# Altium PCB MONO65_A2.PcbDoc (part 3 of 4)
Units mm, origin at the board's own origin, x right, y up, seen from the top; angles counter-clockwise.
Board outline 304.6 x 95.05 mm, 2 copper layers (Component Side, Solder Side), stack 1.586 mm thick; 275 components, 185 nets, 1029 pads, 156 vias.
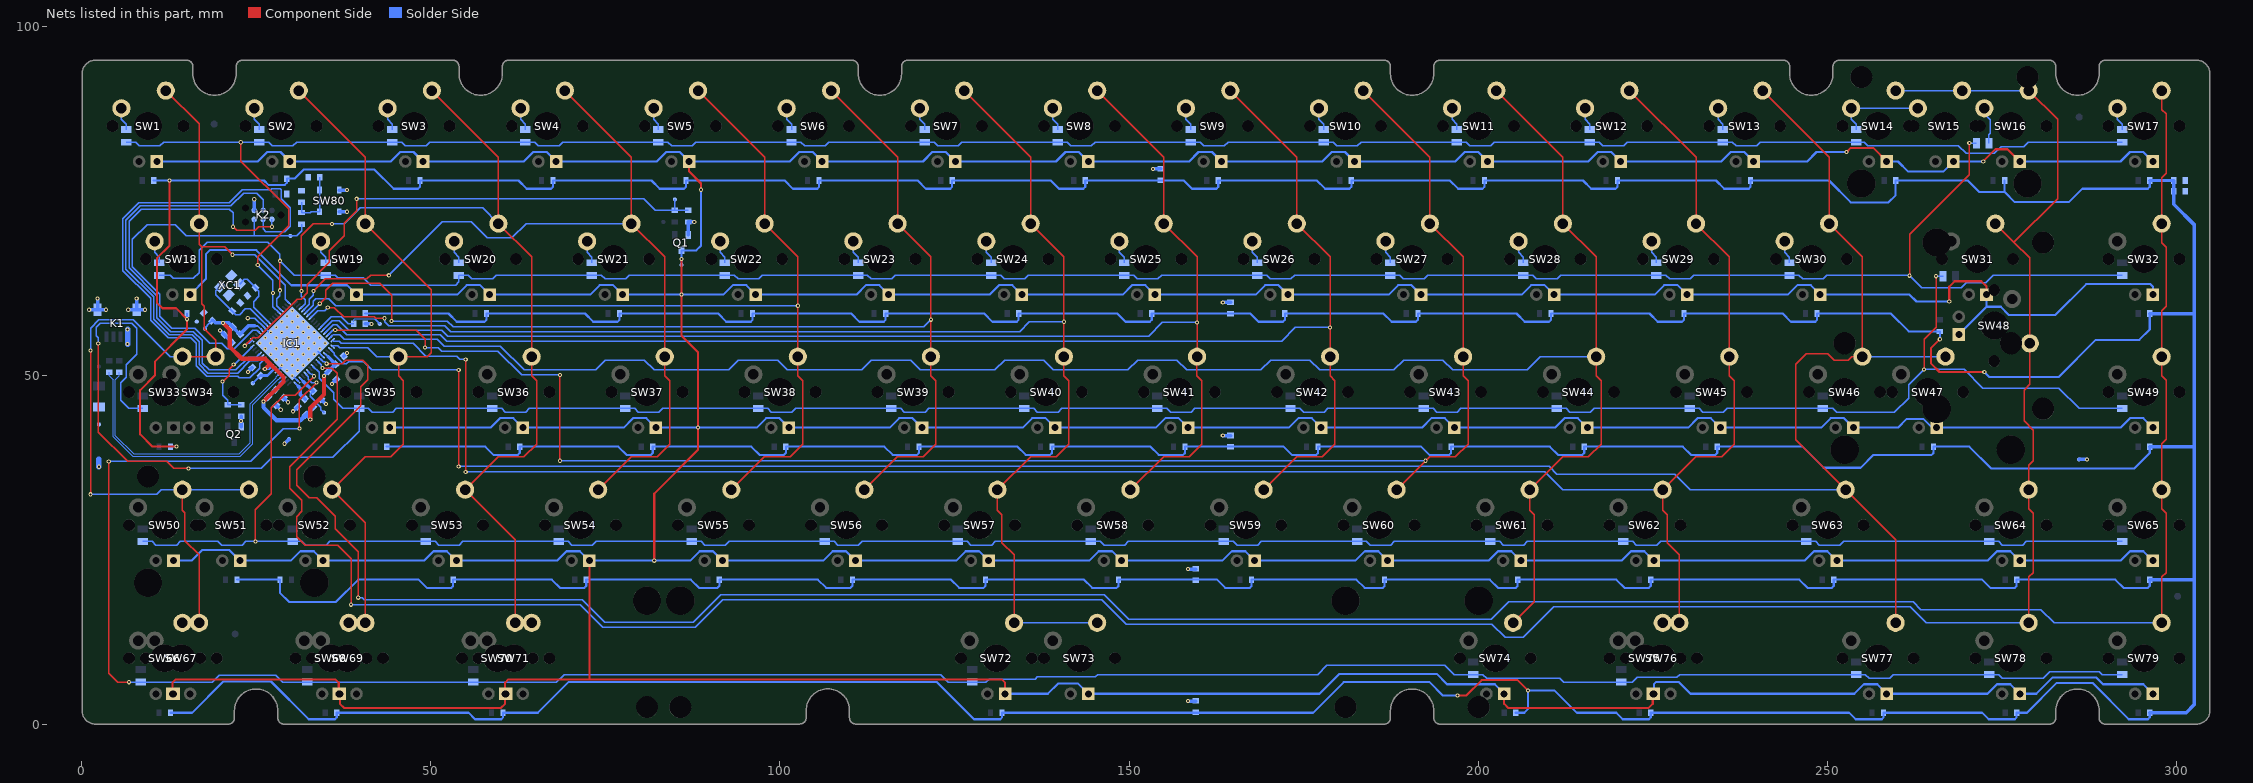
[diagram p2: the nets of this part, all layers, seen from the top]

## Via types
v1: diameter 0.6, hole 0.3, Component Side to Solder Side, tented both sides, 107 vias
v2: diameter 0.5, hole 0.2, Component Side to Solder Side, tented top, 49 vias

## Nets (pads, with @x,y where several pads share a name; then routed paths per layer and width w, separated by ;. In a path a pad name is that pad's centre, name@x,y a point inside that pad or via, vN(x,y) a via of type N, cw(c..) or ccw(c..) an arc to the next point about the centre after c; other vN are vias at no path point) (continued)
5V_LED: C12.1 C13.1 C14.1 C15.1 C16.1 R10.2 R11.1 R17.1 R18.1 R19.1 R20.1 R21.1 R22.1 R23.1 R24.1 R25.1 R26.1 R27.1 R28.1 R29.1 R30.1 R32.1 R33.1 R34.1 R35.1 R36.1 R37.1 R38.1 R39.1 R40.1 R41.1 R42.1 R43.1 R44.1 R45.1 R46.1 R47.1 R48.1 R49.1 R50.1 R51.1 R52.1 R53.1 R54.1 R55.1 R56.1 R57.1 R58.1 R59.1 R61.1 R63.1 R64.1 R66.1 R67.1 R68.1 R69.1 R70.1 R71.1 R72.1 R73.1 R74.1 R75.1 R76.1 R77.1 R78.1 R79.1 R80.1 R82.1 R84.1 R86.1 R88.1 R89.1 R91.1 R92.1 R93.1 R94.2 | length 1637.9
  Component Side w0.3: v1(12.6,77.925) 12.6,68.6 10.795,66.795 10.795,60.433 11.589,59.638 13.542,59.638 v1(15.112,58.068) 15.112,56.612 10.5,52 10.5,50 8.4,47.9 8.4,41.6 10.175,39.825 v1(13.607,39.825) ; v1(197,4.2) 198.241,4.2 200.441,6.4 205.6,6.4 v1(207.1,4.9) ; v1(266.044,55.2) 264.8,53.956 264.8,51.7 266,50.5 v1(272.414,50.5)
  Solder Side w0.3: R17.1@10.35,77.925 v1(12.6,77.925) 26.133,77.925 26.758,77.3 29.122,77.3 29.4,77.578 R18.1@29.4,78.2 30.5,78.2 31.8,79.5 41.937,79.5 44.687,76.75 48.187,76.75 48.45,77.013 R19.1@48.45,77.925 62.562,77.925 63.737,76.75 67.237,76.75 67.5,77.013 R20.1@67.5,77.925 81.612,77.925 82.787,76.75 86.287,76.75 86.55,77.013 R21.1@86.55,77.925 100.662,77.925 101.837,76.75 105.337,76.75 105.6,77.013 R22.1@105.6,77.925 119.712,77.925 120.887,76.75 124.387,76.75 124.65,77.013 R23.1@124.65,77.925 138.762,77.925 139.937,76.75 143.437,76.75 143.7,77.013 R24.1@143.7,77.925 157.812,77.925 158.987,76.75 162.487,76.75 162.75,77.013 R25.1@162.75,77.925 176.862,77.925 178.037,76.75 181.537,76.75 181.8,77.013 R26.1@181.8,77.925 195.912,77.925 197.087,76.75 200.587,76.75 200.85,77.013 R27.1@200.85,77.925 214.962,77.925 216.137,76.75 219.637,76.75 219.9,77.013 R28.1@219.9,77.925 234.012,77.925 235.187,76.75 238.687,76.75 238.95,77.013 R29.1@238.95,77.925 250.175,77.925 253.3,74.8 258.7,74.8 259.725,75.825 R30.1@259.725,77.925 270.048,77.925 271.698,76.275 275.325,76.275 ; R11.1@12.732,39.825 v1(13.607,39.825) ; R80.1@12.732,1.725 15.832,1.725 20.307,6.2 27.131,6.2 32.531,0.8 36.288,0.8 36.544,1.056 R82.1@36.544,1.725 55.418,1.725 56.343,0.8 60.1,0.8 60.356,1.056 R84.1@60.356,1.725 65.325,1.725 69.7,6.1 122.481,6.1 127.781,0.8 131.538,0.8 131.794,1.056 R86.1@131.794,1.725 176.325,1.725 180.7,6.1 193,6.1 194.9,4.2 v1(197,4.2) ; v1(15.112,58.068) R33.1@15.112,58.875 ; R64.1@22.257,20.775 R66.1@28.407,20.775 28.407,18.893 29.7,17.6 36.444,17.6 39.619,20.775 48.275,20.775 49.45,19.6 52.95,19.6 53.213,19.863 R67.1@53.213,20.775 67.325,20.775 68.5,19.6 72,19.6 72.263,19.863 R68.1@72.263,20.775 87.225,20.775 88.4,19.6 91.05,19.6 91.313,19.863 R69.1@91.313,20.775 105.425,20.775 106.6,19.6 110.1,19.6 110.363,19.863 R70.1@110.363,20.775 124.475,20.775 125.65,19.6 129.15,19.6 129.413,19.863 R71.1@129.413,20.775 143.525,20.775 144.7,19.6 148.2,19.6 148.463,19.863 R72.1@148.463,20.775 162.575,20.775 163.75,19.6 167.25,19.6 167.513,19.863 R73.1@167.513,20.775 182.525,20.775 183.7,19.6 186.3,19.6 186.563,19.863 R74.1@186.563,20.775 201.625,20.775 202.8,19.6 205.35,19.6 205.613,19.863 R75.1@205.613,20.775 219.725,20.775 220.9,19.6 224.4,19.6 224.663,19.863 R76.1@224.663,20.775 245.919,20.775 247.094,19.6 250.594,19.6 250.857,19.863 R77.1@250.857,20.775 272.113,20.775 273.288,19.6 276.788,19.6 277.051,19.863 R78.1@277.051,20.775 291.162,20.775 292.337,19.6 295.837,19.6 296.1,19.863 R79.1@296.1,20.775 ; R34.1@40.625,58.875 52.538,58.875 53.713,57.7 57.712,57.7 57.975,57.963 R35.1@57.975,58.875 72.087,58.875 73.262,57.7 76.762,57.7 77.025,57.963 R36.1@77.025,58.875 91.137,58.875 92.312,57.7 95.812,57.7 96.075,57.963 R37.1@96.075,58.875 110.187,58.875 111.362,57.7 114.862,57.7 115.125,57.963 R38.1@115.125,58.875 129.237,58.875 130.412,57.7 133.912,57.7 134.175,57.963 R39.1@134.175,58.875 148.287,58.875 149.462,57.7 152.962,57.7 153.225,57.963 R40.1@153.225,58.875 167.337,58.875 168.512,57.7 172.012,57.7 172.275,57.963 R41.1@172.275,58.875 186.387,58.875 187.562,57.7 191.062,57.7 191.325,57.963 R42.1@191.325,58.875 205.437,58.875 206.612,57.7 210.112,57.7 210.375,57.963 R43.1@210.375,58.875 224.487,58.875 225.662,57.7 229.162,57.7 229.425,57.963 R44.1@229.425,58.875 243.537,58.875 244.712,57.7 248.212,57.7 248.475,57.963 R45.1@248.475,58.875 259.025,58.875 261.575,56.325 R61.1@266.044,56.325 v1(266.044,55.2) ; R48.1@43.688,39.825 57.8,39.825 58.975,38.65 62.475,38.65 62.738,38.913 R49.1@62.738,39.825 76.85,39.825 78.025,38.65 81.525,38.65 81.788,38.913 R50.1@81.788,39.825 95.9,39.825 97.075,38.65 100.575,38.65 100.838,38.913 R51.1@100.838,39.825 114.95,39.825 116.125,38.65 119.625,38.65 119.888,38.913 R52.1@119.888,39.825 134,39.825 135.175,38.65 138.675,38.65 138.938,38.913 R53.1@138.938,39.825 153.05,39.825 154.225,38.65 157.725,38.65 157.988,38.913 R54.1@157.988,39.825 172.1,39.825 173.275,38.65 176.775,38.65 177.038,38.913 R55.1@177.038,39.825 191.798,39.825 192.973,38.65 195.825,38.65 196.088,38.913 R56.1@196.088,39.825 210.2,39.825 211.375,38.65 214.875,38.65 215.138,38.913 R57.1@215.138,39.825 229.25,39.825 230.425,38.65 233.925,38.65 234.188,38.913 R58.1@234.188,39.825 246.402,39.825 249.427,36.8 254.705,36.8 256.555,38.65 264.881,38.65 265.144,38.913 R59.1@265.144,39.825 270.275,39.825 273.4,36.7 293.887,36.7 296.1,38.913 R63.1@296.1,39.825 ; R88.1@205.325,1.725 206.55,1.725 207.1,2.275 v1(207.1,4.9) 210.9,4.9 214.075,1.725 219.725,1.725 220.65,0.8 224.407,0.8 224.663,1.056 R89.1@224.663,1.725 253.062,1.725 253.987,0.8 257.744,0.8 258,1.056 R91.1@258,1.725 272.112,1.725 273.037,0.8 276.794,0.8 277.05,1.056 R92.1@277.05,1.725 278.525,1.725 282.8,6 287.9,6 293.1,0.8 295.844,0.8 296.1,1.056 R93.1@296.1,1.725 ; v1(272.414,50.5) 273.114,49.8 283.075,49.8 288.375,55.1 294.6,55.1 296.1,56.6 R47.1@296.1,58.875 ; R46.1@275.325,77.925 275.325,76.275 ; R32.1@296.1,77.925 296.1,77.013 295.837,76.75 286.45,76.75 284.52,74.82 276.78,74.82 275.325,76.275
  Solder Side w0.5: R93.1@296.1,1.725 301.3,1.725 302.5,2.925 302.5,20.775 ; R79.1@296.1,20.775 302.5,20.775 ; R63.1@296.1,39.825 302.5,39.825 ; R47.1@296.1,58.875 302.5,58.875 ; R32.1@296.1,77.925 R94.2@299.53,77.925 R10.2@299.53,76.4 299.53,74.525 302.5,71.555 302.5,58.875 ; 302.5,20.775 302.5,39.825 ; 302.5,39.825 302.5,58.875
5V_MCU: C1.1 C2.1 C4.1 C5.1 C6.1 C7.1 C8.1 IC1.3 IC1.8 IC1.21 IC1.52 R6.2 R8.2 TP8.1 | length 56.9
  Component Side w0.6: v1(20.25,57.525) 21.24,56.535 21.24,54.11 22.95,52.4 26.3,52.4 28.9,49.8 28.9,49.103 v1(26.063,46.265) ; v1(26.25,50.925) 27,51.675 ; v1(32.75,43.725) 32.75,45.35 34.701,47.301 v1(34.701,49.953)
  Solder Side w0.2: TP8.1@17.7,56.7 17.7,56.781 18.017,57.098 18.017,57.183 R8.2@18.671,57.837 R8.2@18.741,57.907 ; v1(26.25,50.925) 26.855,50.925 27.252,51.322 IC1.8@27.266,51.322
  Solder Side w0.25: 24.8,57.1 25.235,57.1 IC1.21@25.851,56.484 ; 28.625,49.15 28.629,49.15 IC1.3@29.033,49.554 ; IC1.52@34.902,53.09 35.306,52.686
  Solder Side w0.4: C2.1@27.774,47.976 28.375,48.578 28.375,48.9 28.625,49.15
  Solder Side w0.5: R8.2@18.741,57.907 18.793,57.907 19.156,57.544 20.231,57.544 v1(20.25,57.525) 21.078,57.525 C8.1@21.626,56.976 22.682,55.921 C6.1@22.701,55.921 23.881,57.1 24.8,57.1 ; v1(26.063,46.265) 26.711,46.914 C2.1@27.774,47.976 ; v1(32.75,43.725) C4.1@32.101,44.374 32.115,44.374 R6.2@33.183,45.442 ; v1(34.701,49.953) C7.1@35.349,50.601 ; 35.306,52.681 36.369,51.619 36.368,51.619 C7.1@35.349,50.601 ; C7.1@35.349,50.601 C7.1@35.349,50.601
  Solder Side w0.6: v1(26.063,46.265) 26.063,45.449 27.912,43.6 31.328,43.6 C4.1@32.101,44.374
5V_SYS: C11.1 F1.2 R4.1 R7.1 R8.1 R10.1 R94.1 TP2.1 TP7.1
BCKLT_COM_K: Q1.3 SW1.4 SW2.4 SW3.4 SW4.4 SW5.4 SW6.4 SW7.4 SW8.4 SW9.4 SW10.4 SW11.4 SW12.4 SW13.4 SW14.4 SW15.4 SW16.4 SW17.4 SW18.4 SW19.4 SW20.4 SW21.4 SW22.4 SW23.4 SW24.4 SW25.4 SW26.4 SW27.4 SW28.4 SW29.4 SW30.4 SW31.4 SW32.4 SW35.4 SW36.4 SW37.4 SW38.4 SW39.4 SW40.4 SW41.4 SW42.4 SW43.4 SW44.4 SW45.4 SW46.4 SW47.4 SW48.4 SW49.4 SW50.4 SW51.4 SW52.4 SW53.4 SW54.4 SW55.4 SW56.4 SW57.4 SW58.4 SW59.4 SW60.4 SW61.4 SW62.4 SW63.4 SW64.4 SW65.4 SW66.4 SW67.4 SW68.4 SW69.4 SW70.4 SW71.4 SW72.4 SW73.4 SW74.4 SW75.4 SW76.4 SW77.4 SW78.4 SW79.4 TP10.1 | length 1576.6
  Component Side w0.3: SW67.4@13.018,4.445 13.018,6.018 13.502,6.502 ; 13.502,6.5 36.348,6.5 36.83,6.018 SW69.4@36.83,4.445 ; SW68.4@36.989,4.445 36.989,3.011 37.6,2.4 60.031,2.4 60.642,3.011 SW71.4@60.642,4.445 60.642,6.018 61.124,6.5 131.757,6.5 132.239,6.018 SW72.4@132.239,4.445 ; 72.708,6.502 SW54.4@72.708,23.495 ; v1(82,23.495) 82,33.1 88.265,39.365 v1(88.265,42.545) 88.265,53.335 85.9,55.7 v1(85.9,61.595) v1(85.9,66.7) ; SW5.4@86.995,80.645 86.995,79.205 88.7,77.5 v1(88.7,76.6) ; SW74.4@203.677,4.445 203.677,3.011 204.287,2.4 224.275,2.4 224.3,2.425 224.363,2.425 224.949,3.011 SW76.4@224.949,4.445 ; v1(252.7,82) 253.3,82.6 256.49,82.6 SW14.4@258.445,80.645 ; v1(267.4,60.6) 267.4,62.739 268.161,63.5 272,63.5 272.732,62.768 SW31.4@272.732,61.595 ; v1(272.27,80.645) 272.27,80.67 274,82.4 275.74,82.4 SW16.4@277.495,80.645
  Solder Side w0.3: SW1.4@10.795,80.645 25.22,80.645 26.575,82 28.49,82 SW2.4@29.845,80.645 44.27,80.645 45.625,82 47.54,82 SW3.4@48.895,80.645 63.32,80.645 64.675,82 66.59,82 SW4.4@67.945,80.645 82.37,80.645 83.725,82 85.64,82 SW5.4@86.995,80.645 101.42,80.645 102.775,82 104.69,82 SW6.4@106.045,80.645 120.47,80.645 121.825,82 123.74,82 SW7.4@125.095,80.645 139.52,80.645 140.875,82 142.79,82 SW8.4@144.145,80.645 158.57,80.645 159.925,82 161.84,82 SW9.4@163.195,80.645 177.62,80.645 178.975,82 180.89,82 SW10.4@182.245,80.645 196.67,80.645 198.025,82 199.94,82 SW11.4@201.295,80.645 215.72,80.645 217.075,82 218.99,82 SW12.4@220.345,80.645 234.77,80.645 236.125,82 238.04,82 SW13.4@239.395,80.645 247.045,80.645 248.4,82 v1(252.7,82) ; SW50.4@13.177,23.495 15.747,23.495 17.252,25 21.197,25 SW51.4@22.702,23.495 29.983,23.495 31.338,24.85 33.253,24.85 SW52.4@34.608,23.495 49.033,23.495 50.388,24.85 52.303,24.85 SW53.4@53.658,23.495 68.083,23.495 69.438,24.85 71.353,24.85 SW54.4@72.708,23.495 v1(82,23.495) 87.133,23.495 88.488,24.85 90.403,24.85 SW55.4@91.758,23.495 106.183,23.495 107.538,24.85 109.453,24.85 SW56.4@110.808,23.495 125.233,23.495 126.588,24.85 128.503,24.85 SW57.4@129.858,23.495 144.283,23.495 145.638,24.85 147.553,24.85 SW58.4@148.908,23.495 163.333,23.495 164.688,24.85 166.603,24.85 SW59.4@167.958,23.495 182.383,23.495 183.738,24.85 185.653,24.85 SW60.4@187.008,23.495 201.433,23.495 202.788,24.85 204.703,24.85 SW61.4@206.058,23.495 220.483,23.495 221.838,24.85 223.753,24.85 SW62.4@225.108,23.495 246.677,23.495 248.032,24.85 249.947,24.85 SW63.4@251.302,23.495 272.871,23.495 274.226,24.85 276.141,24.85 SW64.4@277.496,23.495 291.921,23.495 293.276,24.85 295.191,24.85 SW65.4@296.545,23.495 ; SW18.4@15.557,61.595 17.85,63.888 17.85,67.425 18.375,67.95 25.017,67.95 30.039,62.927 38.038,62.927 SW19.4@39.37,61.595 53.795,61.595 55.15,62.95 57.065,62.95 SW20.4@58.42,61.595 72.845,61.595 74.2,62.95 76.115,62.95 SW21.4@77.47,61.595 v1(85.9,61.595) 91.895,61.595 93.25,62.95 95.165,62.95 SW22.4@96.52,61.595 110.945,61.595 112.3,62.95 114.215,62.95 SW23.4@115.57,61.595 129.995,61.595 131.35,62.95 133.265,62.95 SW24.4@134.62,61.595 149.045,61.595 150.4,62.95 152.315,62.95 SW25.4@153.67,61.595 168.095,61.595 169.45,62.95 171.365,62.95 SW26.4@172.72,61.595 187.145,61.595 188.5,62.95 190.415,62.95 SW27.4@191.77,61.595 206.195,61.595 207.55,62.95 209.465,62.95 SW28.4@210.82,61.595 225.245,61.595 226.6,62.95 228.515,62.95 SW29.4@229.87,61.595 244.295,61.595 245.65,62.95 247.565,62.95 SW30.4@248.92,61.595 261.705,61.595 262.7,60.6 v1(267.4,60.6) ; SW35.4@44.133,42.545 58.558,42.545 59.913,43.9 61.828,43.9 SW36.4@63.183,42.545 77.608,42.545 78.963,43.9 80.878,43.9 SW37.4@82.233,42.545 v1(88.265,42.545) 96.658,42.545 98.013,43.9 99.928,43.9 SW38.4@101.283,42.545 115.708,42.545 117.063,43.9 118.978,43.9 SW39.4@120.333,42.545 134.758,42.545 136.113,43.9 138.028,43.9 SW40.4@139.383,42.545 153.808,42.545 155.163,43.9 157.078,43.9 SW41.4@158.433,42.545 172.858,42.545 174.213,43.9 176.128,43.9 SW42.4@177.483,42.545 191.908,42.545 193.263,43.9 195.178,43.9 SW43.4@196.533,42.545 210.958,42.545 212.313,43.9 214.228,43.9 SW44.4@215.583,42.545 230.008,42.545 231.363,43.9 233.278,43.9 SW45.4@234.633,42.545 249.058,42.545 250.413,43.9 252.328,43.9 SW46.4@253.683,42.545 260.058,42.545 261.313,43.8 263.7,43.8 264.955,42.545 SW47.4@265.589,42.545 291.92,42.545 293.275,43.9 295.19,43.9 SW49.4@296.545,42.545 ; TP10.1@85.9,65.825 v1(85.9,66.7) Q1.3@85.9,67.925 88.025,67.925 88.7,68.6 v1(88.7,76.6) ; SW72.4@132.239,4.445 138.345,4.445 139.8,5.9 142.69,5.9 SW73.4@144.145,4.445 177.245,4.445 180.1,7.3 194,7.3 195.5,5.8 202.322,5.8 SW74.4@203.677,4.445 ; SW75.4@225.108,4.445 225.108,5.808 225.4,6.1 228.7,6.1 230.355,4.445 253.82,4.445 255.175,5.8 257.09,5.8 SW77.4@258.445,4.445 ; SW14.4@258.445,80.645 260.055,80.645 261.5,79.2 266.525,79.2 SW15.4@267.97,80.645 v1(272.27,80.645) ; SW77.4@258.445,4.445 272.87,4.445 274.225,5.8 276.14,5.8 SW78.4@277.495,4.445 279.845,4.445 282.2,6.8 288.4,6.8 289.4,5.8 295.19,5.8 SW79.4@296.545,4.445 ; SW48.4@268.764,55.88 272.732,59.848 ; SW31.4@272.732,61.595 272.732,59.848 ; SW16.4@277.495,80.645 291.92,80.645 293.275,82 295.19,82 SW17.4@296.545,80.645 ; SW32.4@296.545,61.595 296.545,62.755 296.205,63.095 286.995,63.095 282.575,58.675 275.937,58.675 274.764,59.848 272.732,59.848
GND: C1.2 C2.2 C3.2 C4.2 C5.2 C6.2 C7.2 C8.2 C9.2 C10.2 C12.2 C13.2 C14.2 C15.2 C16.2 IC1.6 IC1.22 IC1.53 IC1.63 IC1.65 K1.0 K1.4 K2.6 Q1.2 Q2.2 R3.2 R9.1 R14.2 R16.2 SW80.2 TP3.1 TP4.1 TP19.1 XC1.2 XC1.4 | length 43.2
  Solder Side w0.2: v1(23.808,58.215) 24.827,58.215 IC1.22@26.205,56.837
  Solder Side w0.25: IC1.22@26.205,56.837 IC1.65@26.877,56.166 ; IC1.6@27.973,50.615 28.644,51.287 v2(28.644,51.499) ; IC1.65@30.341,49.872 IC1.63@31.013,49.201 ; IC1.65@33.877,53.408 IC1.53@34.549,52.736
  Solder Side w0.5: v1(1.1,59.425) K1.0@2.3,59.425 ; v1(2.3,61.025) K1.0@2.3,59.425 ; v1(3.5,59.425) K1.0@2.3,59.425 ; v1(6.7,59.425) K1.0@7.9,59.425 ; v1(7.9,61.025) K1.0@7.9,59.425 ; v1(9.1,59.425) K1.0@7.9,59.425 ; v1(19.825,56.472) C8.2@20.474,55.824 21.529,54.768 C6.2@21.549,54.768 ; Q2.2@22.85,42.7 R16.2@22.85,44.175 ; v1(23.825,50.503) C3.2@24.474,51.151 ; K2.6@24.73,73.635 v1(24.73,75.235) ; C1.2@27.876,45.749 v1(28.525,45.1) ; C2.2@28.926,46.824 v1(29.575,46.175) ; v1(29.065,40.241) TP19.1@29.713,40.89 ; v1(30.3,44.878) C4.2@30.949,45.526 ; R3.2@34.342,46.579 v1(34.99,45.93) ; v1(35.853,48.8) C7.2@36.501,49.449 ; SW80.2@36.9,73.45 v1(38,73.45) ; SW80.2@36.9,76.55 v1(38,76.55) ; C5.2@37.526,52.776 v1(38,53.25) ; R9.1@40.625,57.4 v1(41.5,57.4) ; Q1.2@86.85,70.125 R14.2@86.85,72 v1(87.725,72) ; v1(153.4,79.581) C13.2@154.5,79.581 ; v1(158.4,3.4) C14.2@159.5,3.4 ; v1(158.4,22.3) C15.2@159.5,22.3 ; v1(163.4,41.4) C16.2@164.5,41.4 ; v1(163.4,60.466) C12.2@164.5,60.466 ; TP3.1@286,38 v1(287.1,38)
  Solder Side w0.8: v1(2.5,36.95) TP4.1@2.5,38 ; v1(6.6,54.5) K1.4@6.6,55.55 v1(6.6,56.6)
  other v1: 22.85,43.5
  other v2: 30.2,49.943 29.422,50.721 30.978,50.721 30.2,51.499 31.756,51.499 27.867,52.277 29.422,52.277 30.978,52.277 32.533,52.277 27.089,53.054 28.644,53.054 30.2,53.054 31.756,53.054 33.311,53.054 26.311,53.832 27.867,53.832 29.422,53.832 30.978,53.832 32.533,53.832 34.089,53.832 25.533,54.61 27.089,54.61 28.644,54.61 30.2,54.61 31.756,54.61 33.311,54.61 34.867,54.61 26.311,55.388 27.867,55.388 29.422,55.388 30.978,55.388 32.533,55.388 34.089,55.388 27.089,56.166 28.644,56.166 30.2,56.166 31.756,56.166 33.311,56.166 27.867,56.943 29.422,56.943 30.978,56.943 32.533,56.943 28.644,57.721 30.2,57.721 31.756,57.721 29.422,58.499 30.978,58.499 30.2,59.277
MCU_AREF: IC1.62 R3.1 TP5.1 | length 6.6
  Solder Side w0.2: R3.1@33.175,47.746 33.173,47.744 32.75,47.321 32.75,47.025 34.29,45.485 34.29,45.135 TP5.1@34.725,44.7
  Solder Side w0.25: IC1.62@31.367,49.554 31.771,49.15
  Solder Side w0.5: 31.771,49.146 R3.1@33.173,47.744
MCU_AVCC: IC1.64 R6.1 | length 2.8
  Solder Side w0.25: IC1.64@30.66,48.847 31.064,48.443
  Solder Side w0.5: 31.064,48.439 31.338,48.164 31.338,47.287 R6.1@32.017,46.608
MCU_BCKLT_PWM: IC1.17 R13.1 R14.1 TP11.1 | length 79.6
  Component Side w0.2: v1(23.368,54.259) 24.496,55.388 25.288,55.388 30.86,60.96 31.427,60.96 32.3,61.833 32.3,63 35.5,66.2 35.5,67.9 37.6,70 37.6,71.8 39.4,73.6 v1(39.4,75.3)
  Solder Side w0.2: v1(23.368,54.259) 23.733,54.625 23.992,54.625 IC1.17@24.437,55.07 ; v1(39.4,75.3) 80.5,75.3 82.15,73.65 R13.1@84.95,73.65 ; TP11.1@84.95,75.225 R13.1@84.95,73.65 ; R14.1@86.85,73.65 R13.1@84.95,73.65
MCU_CPSLCK_PWM: IC1.16 R15.1 R16.1 | length 12.3
  Component Side w0.2: v1(20.201,49.146) 21.121,50.066 21.121,50.909 v1(21.792,51.579)
  Solder Side w0.2: v1(20.201,49.146) 20.201,47.216 20.95,46.467 R15.1@20.95,45.825 R16.1@22.85,45.825 ; v1(21.792,51.579) 21.866,51.579 IC1.16@24.437,54.15
MCU_H\W\B\: IC1.43 R9.2 TP9.1 | length 10.2
  Solder Side w0.15: R9.2@38.975,57.7 38.975,57.975 39.15,58.15 41.95,58.15
  Solder Side w0.2: IC1.43@34.195,56.837 35.758,58.4 37.198,58.4 38.198,57.4 R9.2@38.975,57.4 ; 41.95,58.15 TP9.1@42.7,57.4
MCU_MISO: IC1.13 K2.1 | length 61
  Component Side w0.2: v1(21.7,71.3) 22.2,70.8 24.9,70.8 25.4,71.3 v1(27.27,71.3)
  Solder Side w0.2: v1(21.7,71.3) 21.7,73.3 21.179,73.821 8.576,73.821 6.827,72.072 6.827,65.411 10.795,61.443 10.795,58.257 12.764,56.288 16.035,56.288 17.3,55.023 17.3,51.776 18.276,50.8 22.119,50.8 23.919,52.6 24.998,52.6 25.487,53.09 IC1.13@25.498,53.09 ; v1(27.27,71.3) K2.1@27.27,72.365
MCU_MOSI: IC1.12 K2.4 | length 60.6
  Solder Side w0.2: IC1.12@25.851,52.736 25.243,52.128 24.125,52.128 22.343,50.346 18.087,50.346 16.846,51.587 16.846,54.835 15.847,55.833 12.576,55.833 10.341,58.068 10.341,61.255 6.373,65.223 6.373,72.26 8.388,74.276 21.376,74.276 23.2,76.1 25.1,76.1 26,75.2 K2.4@26,73.635
MCU_R\E\S\E\T\: IC1.20 K2.5 R5.2 TP18.1 | length 59.4
  Solder Side w0.2: K2.5@24.73,72.365 24.73,70 ; IC1.20@25.498,56.13 25.484,56.13 25.114,56.5 24.525,56.5 21.857,53.832 20.9,53.832 20.107,54.625 18.375,54.625 16.212,56.788 12.944,56.788 11.225,58.507 11.225,61.652 7.3,65.577 7.3,69.5 9.4,71.6 13.4,71.6 15,70 24.73,70 ; R5.2@31.5,71.675 31.5,70.7 30.8,70 TP18.1@29.9,70 24.73,70
MCU_SCK: IC1.11 K2.3 | length 75.3
  Solder Side w0.2: K2.3@26,72.365 26,71 26.4,70.6 29.1,70.6 29.876,71.376 29.876,74.015 28.592,75.3 28.592,76.633 28.45,76.775 27.251,76.775 27.076,76.6 23,76.6 21.121,74.721 8.203,74.721 5.927,72.445 5.927,65.039 9.895,61.071 9.895,57.884 12.391,55.388 15.662,55.388 16.4,54.65 16.4,51.403 17.903,49.9 22.351,49.9 22.551,49.7 24.125,49.7 25.486,51.061 25.486,51.663 IC1.11@26.205,52.383
MCU_USB_N: IC1.4 R1.2 | length 42.8
  Solder Side w0.135: R1.2@4,50.475 4,49.946 4.533,49.413 4.533,41.244 7.311,38.465 22.733,38.465 24.496,40.228 24.496,45.841 28.155,49.5 28.272,49.5 IC1.4@28.68,49.908
MCU_USB_P: IC1.5 R2.2 | length 41.9
  Solder Side w0.135: R2.2@5.4,50.475 5.4,49.946 4.868,49.413 4.868,41.383 7.45,38.8 22.594,38.8 24.161,40.367 24.161,45.979 27.9,49.718 27.9,49.835 IC1.5@28.326,50.261
MCU_XTAL1: C10.1 IC1.24 XC1.1 | length 9.6
  Solder Side w0.2: XC1.1@22.624,63.095 23.296,63.767 23.744,63.767 C10.1@24.917,62.594 25.408,62.103 25.408,61.35 24.645,60.587 24.645,59.811 IC1.24@26.912,57.544
MCU_XTAL2: C9.1 IC1.23 XC1.3 | length 11.3
  Solder Side w0.2: XC1.3@19.867,62.741 19.245,62.12 19.245,61.566 C9.1@21.569,59.242 22.093,58.718 22.624,58.718 23.473,59.567 24.182,59.567 IC1.23@26.558,57.191
MTRX_C0: IC1.32 SW1.2 SW18.2 SW33.2 SW34.2 SW50.2 SW51.2 SW66.2 SW67.2 | length 147.9
  Component Side w0.2: v1(1.3,33) v1(1.3,53.6) ; SW1.2@12.065,90.805 16.827,86.042 SW18.2@16.827,71.755 16.827,68.797 17.2,68.424 ; SW66.2@14.447,14.605 SW67.2@16.828,14.605 16.828,24.316 14.8,26.344 14.8,30.344 14.447,30.697 SW50.2@14.447,33.655 ; SW33.2@14.446,52.705 SW34.2@19.209,52.705 19.209,55.063 17.557,56.715 17.557,59.94 17.2,60.297 17.2,68.424 ; v1(21.626,67.3) 20.502,68.424 17.2,68.424
  Solder Side w0.2: v1(1.3,33) 10.8,33 11.455,33.655 SW50.2@14.447,33.655 SW51.2@23.972,33.655 ; v1(1.3,53.6) 1.3,56.8 2.475,57.975 7.425,57.975 12.695,52.705 SW33.2@14.446,52.705 ; v1(21.626,67.3) 24.827,67.3 29.2,62.927 29.2,60.913 IC1.32@29.74,60.373
MTRX_C1: IC1.49 SW2.2 SW19.2 SW35.2 SW52.2 SW68.2 SW69.2 | length 109.6
  Component Side w0.2: SW2.2@31.115,90.805 40.64,81.28 SW19.2@40.64,71.755 50.1,62.295 50.1,53.3 49.505,52.705 SW35.2@45.403,52.705 45.4,52.702 45.4,49.943 46.1,49.243 46.1,40.2 44.3,38.4 40.623,38.4 SW52.2@35.878,33.655 40.64,28.893 SW69.2@40.64,14.605 SW68.2@38.259,14.605
  Solder Side w0.2: IC1.49@35.963,54.15 36.113,54.3 36.666,54.3 36.966,54 41,54 42.295,52.705 SW35.2@45.403,52.705
MTRX_C2: IC1.35 SW3.2 SW20.2 SW36.2 SW53.2 SW70.2 SW71.2 | length 135.7
  Component Side w0.2: v1(31.49,62.1) 31.49,69.99 33.2,71.7 v1(35.853,71.7) ; SW3.2@50.165,90.805 59.69,81.28 SW20.2@59.69,71.755 ; SW20.2@59.693,71.758 64.456,66.995 SW36.2@64.456,52.708 ; SW70.2@62.071,14.605 62.071,26.512 SW53.2@54.928,33.655 59.673,38.4 63.35,38.4 65.15,40.2 65.15,49.243 64.45,49.943 SW36.2@64.45,52.702
  Component Side w0.3: SW70.2@62.071,14.605 SW71.2@64.452,14.605
  Solder Side w0.2: IC1.35@31.367,59.666 32,60.299 32,60.871 31.49,61.38 v1(31.49,62.1) ; v1(35.853,71.7) 37.6,71.7 39.916,74.016 57.429,74.016 SW20.2@59.69,71.755
MTRX_C3: IC1.36 SW4.2 SW21.2 SW37.2 SW54.2 | length 124.6
  Component Side w0.2: v1(33.2,62.1) 34.925,63.825 40.875,63.825 41.4,64.35 v1(44,64.35) ; SW4.2@69.215,90.805 78.74,81.28 SW21.2@78.74,71.755 83.503,66.992 SW37.2@83.503,52.705 ; SW54.2@73.978,33.655 78.723,38.4 82.4,38.4 84.2,40.2 84.2,49.243 83.5,49.943 SW37.2@83.5,52.702
  Solder Side w0.2: IC1.36@31.72,59.312 32.046,59.638 32.6,60.192 32.6,60.93 33.2,61.53 v1(33.2,62.1) ; v1(44,64.35) 51.65,72 55.8,72 58.1,69.7 61.613,69.7 63.668,71.755 SW21.2@78.74,71.755
MTRX_C4: IC1.37 SW5.2 SW22.2 SW38.2 SW55.2 | length 141.8
  Component Side w0.2: SW5.2@88.265,90.805 97.79,81.28 SW22.2@97.79,71.755 ; SW55.2@93.028,33.655 97.773,38.4 101.45,38.4 103.25,40.2 103.25,49.243 102.55,49.943 SW38.2@102.55,52.702 ; SW22.2@97.793,71.758 102.556,66.995 v1(102.556,60) SW38.2@102.556,52.708
  Solder Side w0.2: IC1.37@32.074,58.959 32.4,59.285 33.173,60.058 33.173,60.635 33.538,61 35.4,61 36.4,60 v1(102.556,60)
MTRX_C5: IC1.38 SW6.2 SW23.2 SW39.2 SW56.2 | length 166.6
  Component Side w0.2: v1(34.111,60.288) 34.982,61.16 34.982,62.182 36,63.2 42.715,63.2 44.4,61.515 v1(44.4,57.8) ; SW6.2@107.315,90.805 116.84,81.28 SW23.2@116.84,71.755 121.603,66.992 v1(121.603,58) SW39.2@121.603,52.705 ; SW56.2@112.078,33.655 116.823,38.4 120.5,38.4 122.3,40.2 122.3,49.243 121.6,49.943 SW39.2@121.6,52.702
  Solder Side w0.2: IC1.38@32.427,58.605 32.754,58.931 v1(34.111,60.288) ; v1(44.4,57.8) 52.388,57.8 53.212,56.976 120.579,56.976 v1(121.603,58)
MTRX_C6: IC1.39 SW7.2 SW24.2 SW40.2 SW57.2 SW72.2 SW73.2 | length 212.5
  Component Side w0.2: v1(35.256,59.731) 36.199,59.731 37.53,58.4 41.9,58.4 42.1,58.2 v1(43.4,58.2) ; SW7.2@126.365,90.805 135.89,81.28 SW24.2@135.89,71.755 140.653,66.992 v1(140.653,57.7) SW40.2@140.653,52.705 ; SW72.2@133.509,14.605 133.509,24.316 131.775,26.05 131.775,30.05 131.128,30.697 SW57.2@131.128,33.655 135.873,38.4 139.55,38.4 141.35,40.2 141.35,49.243 140.65,49.943 SW40.2@140.65,52.702
  Solder Side w0.2: IC1.39@32.781,58.252 33.107,58.578 33.829,59.3 34.824,59.3 v1(35.256,59.731) ; v1(43.4,58.2) 43.4,57.7 44,57.1 52.038,57.1 52.838,56.3 134.3,56.3 135.7,57.7 v1(140.653,57.7) ; SW72.2@133.509,14.605 SW73.2@145.415,14.605
MTRX_C7: IC1.44 SW8.2 SW25.2 SW41.2 SW58.2 | length 197.2
  Component Side w0.2: SW8.2@145.415,90.805 154.94,81.28 SW25.2@154.94,71.755 159.703,66.992 v1(159.703,57.6) SW41.2@159.703,52.705 ; SW58.2@150.178,33.655 154.923,38.4 158.6,38.4 160.4,40.2 160.4,49.243 159.7,49.943 SW41.2@159.7,52.702
  Solder Side w0.2: IC1.44@34.549,56.484 34.875,56.81 35.89,57.825 36.918,57.825 38.243,56.5 51.57,56.5 52.445,55.625 134.7,55.625 152.775,55.625 154.75,57.6 v1(159.703,57.6)
MTRX_C8: IC1.45 SW9.2 SW26.2 SW42.2 SW59.2 | length 215.9
  Component Side w0.2: SW9.2@164.465,90.805 173.99,81.28 SW26.2@173.99,71.755 178.753,66.992 v1(178.753,56.9) SW42.2@178.753,52.705 ; SW59.2@169.228,33.655 173.973,38.4 177.65,38.4 179.45,40.2 179.45,49.243 178.75,49.943 SW42.2@178.75,52.702
  Solder Side w0.2: IC1.45@34.902,56.13 35.228,56.456 36.072,57.3 36.53,57.3 38.007,55.824 51.364,55.824 52.263,54.925 171.825,54.925 173.8,56.9 v1(178.753,56.9)
MTRX_C9: IC1.46 SW10.2 SW27.2 SW43.2 SW60.2 | length 242.9
  Component Side w0.2: v1(36.325,56.5) 47.9,56.5 49.2,55.2 v1(49.2,54) ; v1(68.5,37.8) v1(68.5,50.1) ; SW10.2@183.515,90.805 193.04,81.28 SW27.2@193.04,71.755 197.803,66.992 SW43.2@197.803,52.705 ; SW60.2@188.278,33.655 v1(192.423,37.8) 193.023,38.4 196.7,38.4 198.5,40.2 198.5,49.243 197.8,49.943 SW43.2@197.8,52.702
  Solder Side w0.2: IC1.46@35.256,55.777 35.582,56.103 35.979,56.5 v1(36.325,56.5) ; v1(49.2,54) 51.071,54 51.6,53.471 59.629,53.471 63,50.1 v1(68.5,50.1) ; v1(68.5,37.8) v1(192.423,37.8)
MTRX_C10: IC1.47 SW11.2 SW28.2 SW44.2 SW61.2 SW74.2 | length 282.7
  Component Side w0.2: SW11.2@202.565,90.805 212.09,81.28 SW28.2@212.09,71.755 216.853,66.992 SW44.2@216.853,52.705 ; SW74.2@204.947,14.605 207.975,17.633 207.975,30.05 207.328,30.697 SW61.2@207.328,33.655 212.073,38.4 215.75,38.4 217.55,40.2 217.55,49.243 216.85,49.943 SW44.2@216.85,52.702
  Solder Side w0.2: IC1.47@35.609,55.423 35.936,55.749 36.01,55.824 36.964,55.824 37.588,55.2 50.963,55.2 51.963,54.2 59.987,54.2 63.387,50.8 73.6,50.8 75,52.2 80.6,52.2 82,50.8 92.65,50.8 94.05,52.2 99.65,52.2 101.05,50.8 111.7,50.8 113.1,52.2 118.7,52.2 120.1,50.8 130.75,50.8 132.15,52.2 137.75,52.2 139.15,50.8 149.8,50.8 151.2,52.2 156.8,52.2 158.2,50.8 168.85,50.8 170.25,52.2 175.85,52.2 177.25,50.8 187.9,50.8 189.3,52.2 194.9,52.2 196.3,50.8 206.95,50.8 208.855,52.705 SW44.2@216.853,52.705
MTRX_C11: IC1.48 SW12.2 SW29.2 SW45.2 SW62.2 SW75.2 SW76.2 | length 300.9
  Component Side w0.2: v1(55,36.2) v1(55,52.3) ; SW12.2@221.615,90.805 231.14,81.28 SW29.2@231.14,71.755 235.903,66.992 SW45.2@235.903,52.705 ; SW75.2@226.378,14.605 SW76.2@228.759,14.605 228.759,24.316 227.025,26.05 227.025,30.05 226.378,30.697 SW62.2@226.378,33.655 231.123,38.4 234.8,38.4 236.6,40.2 236.6,49.243 235.9,49.943 SW45.2@235.9,52.702
  Solder Side w0.2: IC1.48@35.963,55.07 36.133,54.9 36.898,54.9 37.198,54.6 47.497,54.6 49.321,52.776 53.706,52.776 54.183,52.3 v1(55,52.3) ; v1(55,36.2) 209.5,36.2 212.045,33.655 SW62.2@226.378,33.655
MTRX_C12: IC1.50 SW13.2 SW30.2 SW46.2 SW47.2 SW63.2 SW77.2 | length 343.4
  Component Side w0.2: v1(54,37) v1(54,50.8) ; SW13.2@240.665,90.805 250.19,81.28 SW30.2@250.19,71.755 ; SW30.2@250.193,71.758 254.956,66.995 SW46.2@254.956,52.708 ; SW46.2@254.953,52.705 253.406,52.705 252.901,52.2 250.9,52.2 250,53.1 246.933,53.1 245.425,51.592 245.425,40.802 SW63.2@252.572,33.655 259.715,26.511 SW77.2@259.715,14.605
  Solder Side w0.2: IC1.50@35.609,53.797 35.936,53.471 36.206,53.2 36.206,52.944 37.487,51.663 37.923,51.663 38.259,52 40.387,52 41.587,50.8 v1(54,50.8) ; v1(54,37) 210.12,37 211.22,35.9 228.1,35.9 230.345,33.655 SW63.2@252.572,33.655 ; SW46.2@254.953,52.705 SW47.2@266.859,52.705
MTRX_C13: IC1.55 SW14.2 SW15.2 SW16.2 SW31.2 SW48.2 SW64.2 SW78.2 | length 400.6
  Component Side w0.2: v1(34.5,51.1) 34.55,51.05 35.85,51.05 36.583,50.317 36.583,43.752 29.8,36.969 29.8,33.9 31.535,32.165 31.535,30.545 30.8,29.81 30.8,26.9 32,25.7 36.7,25.7 38.6,23.8 v1(38.6,17.2) ; SW31.2@274.002,71.755 276.657,69.1 ; SW78.2@278.765,14.605 278.765,21.165 279.4,21.8 279.4,30.3 278.766,30.934 SW64.2@278.766,33.655 278.766,37.166 279.4,37.8 279.4,42.2 278.1,43.5 278.1,47.9 278.924,48.724 SW48.2@278.924,54.61 278.924,66.833 276.657,69.1 ; SW16.2@278.765,90.805 282.9,86.67 282.9,75.343 276.657,69.1
  Solder Side w0.2: IC1.55@33.842,52.029 34.168,51.703 34.291,51.579 34.291,51.308 v1(34.5,51.1) ; v1(38.6,17.2) 71.4,17.2 74.6,14 87.9,14 91.8,17.9 146.1,17.9 149.6,14.4 201.9,14.4 203.8,12.5 206.4,12.5 210.8,16.9 261.8,16.9 264.095,14.605 SW78.2@278.765,14.605 ; SW14.2@259.715,90.805 SW15.2@269.24,90.805 SW16.2@278.765,90.805
MTRX_C14: IC1.54 SW17.2 SW32.2 SW49.2 SW65.2 SW79.2 | length 392.7
  Component Side w0.2: v1(35.1,51.7) 37.3,51.7 37.8,52.2 40.3,52.2 41,51.5 41,49.4 40,48.4 40,45.7 30.824,36.524 30.824,34.276 32.6,32.5 33.69,32.5 36.348,29.842 36.348,28.052 39.619,24.781 v1(39.619,18.2) ; SW79.2@297.815,14.605 297.815,21.165 298.45,21.8 298.45,30.3 297.816,30.934 SW65.2@297.815,33.655 ; SW65.2@297.815,33.655 297.815,40.215 298.45,40.85 298.45,49.35 297.816,49.984 SW49.2@297.815,52.705 ; SW49.2@297.815,52.705 297.815,59.265 298.45,59.9 298.45,68.4 297.816,69.034 SW32.2@297.815,71.755 ; SW32.2@297.815,71.755 297.815,78.315 298.45,78.95 298.45,87.45 297.816,88.084 SW17.2@297.815,90.805
  Solder Side w0.2: IC1.54@34.195,52.383 34.521,52.056 34.62,51.958 34.842,51.958 v1(35.1,51.7) ; v1(39.619,18.2) 40.2,18.2 40.5,17.9 71.7,17.9 74.9,14.7 87.6,14.7 91.5,18.6 146.4,18.6 149.9,15.1 201.8,15.1 204.3,17.6 262.249,17.6 263.349,16.5 280.5,16.5 282.395,14.605 SW79.2@297.815,14.605
MTRX_R0: D1.1 D2.1 D3.1 D4.1 D5.1 D6.1 D7.1 D8.1 D9.1 D10.1 D11.1 D12.1 D13.1 D14.1 D17.1 IC1.28 | length 323.1
  Component Side w0.2: v1(22.8,83.4) 22.8,80.7 29.65,73.85 29.65,71.45 25.235,67.035 v1(25.235,65.825)
  Solder Side w0.2: D1.1@6.4,83.4 7.75,83.4 8.275,82.875 11.225,82.875 11.75,83.4 v1(22.8,83.4) D2.1@25.45,83.4 26.8,83.4 27.325,82.875 30.275,82.875 30.8,83.4 D3.1@44.5,83.4 45.85,83.4 46.375,82.875 49.325,82.875 49.85,83.4 D4.1@63.55,83.4 64.9,83.4 65.425,82.875 68.375,82.875 68.9,83.4 D5.1@82.6,83.4 83.95,83.4 84.475,82.875 87.425,82.875 87.95,83.4 D6.1@101.65,83.4 103,83.4 103.525,82.875 106.475,82.875 107,83.4 D7.1@120.7,83.4 122.05,83.4 122.575,82.875 125.525,82.875 126.05,83.4 D8.1@139.75,83.4 141.1,83.4 141.625,82.875 144.575,82.875 145.1,83.4 D9.1@158.8,83.4 160.15,83.4 160.675,82.875 163.625,82.875 164.15,83.4 D10.1@177.85,83.4 179.2,83.4 179.725,82.875 182.675,82.875 183.2,83.4 D11.1@196.9,83.4 198.25,83.4 198.775,82.875 201.725,82.875 202.25,83.4 D12.1@215.95,83.4 217.3,83.4 217.825,82.875 220.775,82.875 221.3,83.4 D13.1@235,83.4 236.35,83.4 236.875,82.875 239.825,82.875 240.35,83.4 D14.1@254.05,83.4 255.25,83.4 255.75,82.9 268.7,82.9 269.8,81.8 273.85,81.8 274.825,82.775 278.075,82.775 278.7,83.4 D17.1@292.15,83.4 ; v1(25.235,65.825) 27.4,63.66 v1(27.4,61.8) 27.4,59.885 IC1.28@28.326,58.959
MTRX_R1: D16.1 D18.1 D19.1 D20.1 D21.1 D22.1 D23.1 D24.1 D25.1 D26.1 D27.1 D28.1 D29.1 D30.1 D32.1 IC1.29 | length 326.8
  Component Side w0.2: v1(28.4,66.425) 28.407,66.418 v1(28.407,62.2) ; v1(261.725,64.3) 261.725,70.225 270.273,78.773 v1(270.273,83.275)
  Solder Side w0.2: D18.1@11.162,64.35 12.7,64.35 13.125,63.925 16.025,63.925 16.827,64.727 16.827,67.924 18.003,69.1 26.7,69.1 28.4,67.4 v1(28.4,66.425) 30.475,64.35 D19.1@34.975,64.35 36.325,64.35 36.675,64 40.35,64 41.4,62.95 53.55,62.95 54.025,63.425 D20.1@54.025,64.35 55.375,64.35 55.9,63.825 58.85,63.825 59.375,64.35 D21.1@73.075,64.35 74.425,64.35 74.95,63.825 77.9,63.825 78.425,64.35 D22.1@92.125,64.35 93.475,64.35 94,63.825 96.95,63.825 97.475,64.35 D23.1@111.175,64.35 112.525,64.35 113.05,63.825 116,63.825 116.525,64.35 D24.1@130.225,64.35 131.575,64.35 132.1,63.825 135.05,63.825 135.575,64.35 D25.1@149.275,64.35 150.625,64.35 151.15,63.825 154.1,63.825 154.625,64.35 D26.1@168.325,64.35 169.675,64.35 170.2,63.825 173.15,63.825 173.675,64.35 D27.1@187.375,64.35 188.725,64.35 189.25,63.825 192.2,63.825 192.725,64.35 D28.1@206.425,64.35 207.775,64.35 208.3,63.825 211.25,63.825 211.775,64.35 D29.1@225.475,64.35 226.825,64.35 227.35,63.825 230.3,63.825 230.825,64.35 D30.1@244.525,64.35 245.875,64.35 246.4,63.825 249.35,63.825 249.875,64.35 v1@261.725,64.35 ; v1(28.407,62.2) 28.407,61.449 27.973,61.014 27.973,60.019 IC1.29@28.68,59.312 ; v1(261.725,64.3) 263.475,62.55 269.1,62.55 269.85,63.3 272.65,63.3 273.7,64.35 D32.1@292.15,64.35 ; v1(270.273,83.275) D16.1@271.273,83.275
MTRX_R2: D33.1 D35.1 D36.1 D37.1 D38.1 D39.1 D40.1 D41.1 D42.1 D43.1 D44.1 D45.1 D46.1 D48.1 D49.1 IC1.57 | length 369.9
  Component Side w0.2: v1(2.4,54.6) 2.4,41.9 6.6,37.7 12.2,37.7 13.2,36.7 v1(15.3,36.7) ; v1(263.8,50.875) 263.8,55.2 265.511,56.911 v1(265.511,64.225)
  Solder Side w0.2: v1(2.4,54.6) 2.4,55.4 2.1,55.7 2.1,56.9 2.7,57.5 7.2,57.5 7.9,56.8 7.9,53.05 6.4,51.55 6.4,49.754 5.626,48.981 5.626,46.474 6.8,45.3 D33.1@8.782,45.3 ; v1(15.3,36.7) 25.726,36.7 27.326,38.3 36,38.3 39.738,42.038 D35.1@39.738,45.3 ; IC1.57@33.134,51.322 34.007,50.449 34.007,49.642 36.1,47.549 36.1,46.626 37.426,45.3 D35.1@39.738,45.3 ; v1(265.511,64.225) D48.1@266.511,64.225 ; D49.1@292.15,45.3 285.975,45.3 283.075,48.2 272.2,48.2 269.525,50.875 v1(263.8,50.875) 261.575,48.65 261.575,46.775 259.525,44.725 251.275,44.725 250.7,45.3 D46.1@249.288,45.3 235.588,45.3 235.063,44.775 232.113,44.775 231.588,45.3 D45.1@230.238,45.3 216.538,45.3 216.013,44.775 213.063,44.775 212.538,45.3 D44.1@211.188,45.3 197.488,45.3 196.963,44.775 194.013,44.775 193.488,45.3 D43.1@192.138,45.3 178.438,45.3 177.913,44.775 174.963,44.775 174.438,45.3 D42.1@173.088,45.3 159.388,45.3 158.863,44.775 155.913,44.775 155.388,45.3 D41.1@154.038,45.3 140.338,45.3 139.813,44.775 136.863,44.775 136.338,45.3 D40.1@134.988,45.3 121.288,45.3 120.763,44.775 117.813,44.775 117.288,45.3 D39.1@115.938,45.3 102.238,45.3 101.713,44.775 98.763,44.775 98.238,45.3 D38.1@96.888,45.3 83.188,45.3 82.663,44.775 79.713,44.775 79.188,45.3 D37.1@77.838,45.3 64.138,45.3 63.613,44.775 60.663,44.775 60.138,45.3 D36.1@58.788,45.3 45.088,45.3 44.563,44.775 41.613,44.775 41.088,45.3 D35.1@39.738,45.3
MTRX_R3: D50.1 D52.1 D53.1 D54.1 D55.1 D56.1 D57.1 D58.1 D59.1 D60.1 D61.1 D62.1 D63.1 D64.1 D65.1 IC1.59 | length 319.2
  Component Side w0.2: v1(24.9,26.25) 24.9,30.8 27.2,33.1 27.2,45.4 29,47.2 30.6,47.2 v1(33.3,49.9) v1@33.357,49.843
  Solder Side w0.2: D50.1@8.782,26.25 10.132,26.25 10.657,25.725 13.607,25.725 14.132,26.25 19.525,26.25 20.05,25.725 23,25.725 23.525,26.25 v1(24.9,26.25) D52.1@30.213,26.25 31.563,26.25 32.088,25.725 35.038,25.725 35.563,26.25 D53.1@49.263,26.25 50.613,26.25 51.138,25.725 54.088,25.725 54.613,26.25 D54.1@68.313,26.25 69.663,26.25 70.188,25.725 73.138,25.725 73.663,26.25 D55.1@87.363,26.25 88.713,26.25 89.238,25.725 92.188,25.725 92.713,26.25 D56.1@106.413,26.25 107.763,26.25 108.288,25.725 111.238,25.725 111.763,26.25 D57.1@125.463,26.25 126.813,26.25 127.338,25.725 130.288,25.725 130.813,26.25 D58.1@144.513,26.25 145.863,26.25 146.388,25.725 149.338,25.725 149.863,26.25 D59.1@163.563,26.25 164.913,26.25 165.438,25.725 168.388,25.725 168.913,26.25 D60.1@182.613,26.25 183.963,26.25 184.488,25.725 187.438,25.725 187.963,26.25 D61.1@201.663,26.25 203.013,26.25 203.538,25.725 206.488,25.725 207.013,26.25 D62.1@220.713,26.25 222.063,26.25 222.588,25.725 225.538,25.725 226.063,26.25 D63.1@246.907,26.25 248.257,26.25 248.782,25.725 251.732,25.725 252.257,26.25 D64.1@273.101,26.25 274.451,26.25 274.976,25.725 277.926,25.725 278.451,26.25 D65.1@292.15,26.25 ; IC1.59@32.427,50.615 32.754,50.289 32.877,50.165 33.035,50.165 v1(33.3,49.9)
MTRX_R4: D66.1 D68.1 D70.1 D72.1 D74.1 D75.1 D77.1 D78.1 D79.1 IC1.60 | length 363.6
  Component Side w0.2: v1(3.9,37.7) 3.9,7.407 5.207,6.1 v1(6.8,6.1) ; v1(31.2,42.4) 31.2,46.545 v1(33.655,49)
  Solder Side w0.2: v1(3.9,37.7) 24.198,37.7 28.898,42.4 v1(31.2,42.4) ; v1(6.8,6.1) D66.1@8.482,6.1 18.7,6.1 19.7,7.1 27.8,7.1 28.8,6.1 D68.1@32.294,6.1 D70.1@56.106,6.1 68,6.1 69.1,7.2 123,7.2 124.1,6.1 D72.1@127.544,6.1 129.475,6.1 129.925,6.55 136.525,6.55 136.85,6.875 145.15,6.875 145.475,7.2 177,7.2 178.3,8.5 195.2,8.5 196.5,7.2 D74.1@199.282,7.2 200.632,7.2 201.157,6.675 211.65,6.675 212.225,6.1 D75.1@220.413,6.1 222,6.1 222.7,6.8 228.4,6.8 228.8,7.2 D77.1@254.051,7.2 255.401,7.2 255.926,6.675 258.875,6.675 259.4,7.2 D78.1@273.1,7.2 274.45,7.2 274.975,6.675 280.875,6.675 281.8,7.6 288.9,7.6 289.3,7.2 D79.1@292.15,7.2 ; IC1.60@32.074,50.261 32.5,49.835 32.5,49.501 33.001,49 v1(33.655,49)
NetC3_1: C3.1 IC1.7 TP6.1 | length 3.9
  Solder Side w0.2: TP6.1@24.525,48.9 24.528,48.9 C3.1@25.626,49.999
  Solder Side w0.25: 27.215,50.564 IC1.7@27.619,50.968
  Solder Side w0.4: C3.1@25.626,49.999 26.645,49.999 27.211,50.564
NetC11_2: C11.2 R4.2 R5.1 SW80.1 | length 9.1
  Solder Side w0.2: R4.2@31.5,74.82 R5.1@31.5,73.325 32.781,73.325 32.906,73.45 SW80.1@34.1,73.45 SW80.1@34.1,76.55 C11.2@34.1,78.4
NetD1_2: D1.2 SW1.1 | length 3.3
  Solder Side w0.2: SW1.1@5.715,88.265 5.715,86.685 6.4,86 D1.2@6.4,85.2
NetD2_2: D2.2 SW2.1 | length 3.3
  Solder Side w0.2: SW2.1@24.765,88.265 24.765,86.685 25.45,86 D2.2@25.45,85.2
NetD3_2: D3.2 SW3.1 | length 3.3
  Solder Side w0.2: SW3.1@43.815,88.265 43.815,86.685 44.5,86 D3.2@44.5,85.2
NetD4_2: D4.2 SW4.1 | length 3.3
  Solder Side w0.2: SW4.1@62.865,88.265 62.865,86.685 63.55,86 D4.2@63.55,85.2
NetD5_2: D5.2 SW5.1 | length 3.3
  Solder Side w0.2: SW5.1@81.915,88.265 81.915,86.685 82.6,86 D5.2@82.6,85.2
NetD6_2: D6.2 SW6.1 | length 3.3
  Solder Side w0.2: SW6.1@100.965,88.265 100.965,86.685 101.65,86 D6.2@101.65,85.2
NetD7_2: D7.2 SW7.1 | length 3.3
  Solder Side w0.2: SW7.1@120.015,88.265 120.015,86.685 120.7,86 D7.2@120.7,85.2
NetD8_2: D8.2 SW8.1 | length 3.3
  Solder Side w0.2: SW8.1@139.065,88.265 139.065,86.685 139.75,86 D8.2@139.75,85.2
NetD9_2: D9.2 SW9.1 | length 3.3
  Solder Side w0.2: SW9.1@158.115,88.265 158.115,86.685 158.8,86 D9.2@158.8,85.2
NetD10_2: D10.2 SW10.1 | length 3.3
  Solder Side w0.2: SW10.1@177.165,88.265 177.165,86.685 177.85,86 D10.2@177.85,85.2
NetD11_2: D11.2 SW11.1 | length 3.3
  Solder Side w0.2: SW11.1@196.215,88.265 196.215,86.685 196.9,86 D11.2@196.9,85.2
NetD12_2: D12.2 SW12.1 | length 3.3
  Solder Side w0.2: SW12.1@215.265,88.265 215.265,86.685 215.95,86 D12.2@215.95,85.2
NetD13_2: D13.2 SW13.1 | length 3.3
  Solder Side w0.2: SW13.1@234.315,88.265 234.315,86.685 235,86 D13.2@235,85.2
NetD14_2: D14.2 SW14.1 SW15.1 | length 12.9
  Solder Side w0.2: D14.2@254.05,85.2 254.05,86 253.365,86.685 SW14.1@253.365,88.265 SW15.1@262.89,88.265
NetD16_2: D16.2 SW16.1 | length 5.5
  Solder Side w0.2: SW16.1@272.415,88.265 272.415,87.485 273.3,86.6 273.3,84.725 273.073,84.498 D16.2@273.073,83.275
NetD17_2: D17.2 SW17.1 | length 3.3
  Solder Side w0.2: SW17.1@291.465,88.265 291.465,86.685 292.15,86 D17.2@292.15,85.2
NetD18_2: D18.2 SW18.1 | length 3.3
  Solder Side w0.2: SW18.1@10.477,69.215 10.477,67.635 11.162,66.95 D18.2@11.162,66.15
NetD19_2: D19.2 SW19.1 | length 3.3
  Solder Side w0.2: SW19.1@34.29,69.215 34.29,67.635 34.975,66.95 D19.2@34.975,66.15
NetD20_2: D20.2 SW20.1 | length 3.3
  Solder Side w0.2: SW20.1@53.34,69.215 53.34,67.635 54.025,66.95 D20.2@54.025,66.15
NetD21_2: D21.2 SW21.1 | length 3.3
  Solder Side w0.2: SW21.1@72.39,69.215 72.39,67.635 73.075,66.95 D21.2@73.075,66.15
NetD22_2: D22.2 SW22.1 | length 3.3
  Solder Side w0.2: SW22.1@91.44,69.215 91.44,67.635 92.125,66.95 D22.2@92.125,66.15
NetD23_2: D23.2 SW23.1 | length 3.3
  Solder Side w0.2: SW23.1@110.49,69.215 110.49,67.635 111.175,66.95 D23.2@111.175,66.15
NetD24_2: D24.2 SW24.1 | length 3.3
  Solder Side w0.2: SW24.1@129.54,69.215 129.54,67.635 130.225,66.95 D24.2@130.225,66.15
NetD25_2: D25.2 SW25.1 | length 3.3
  Solder Side w0.2: SW25.1@148.59,69.215 148.59,67.635 149.275,66.95 D25.2@149.275,66.15
NetD26_2: D26.2 SW26.1 | length 3.3
  Solder Side w0.2: SW26.1@167.64,69.215 167.64,67.635 168.325,66.95 D26.2@168.325,66.15
NetD27_2: D27.2 SW27.1 | length 3.3
  Solder Side w0.2: SW27.1@186.69,69.215 186.69,67.635 187.375,66.95 D27.2@187.375,66.15
NetD28_2: D28.2 SW28.1 | length 3.3
  Solder Side w0.2: SW28.1@205.74,69.215 205.74,67.635 206.425,66.95 D28.2@206.425,66.15
NetD29_2: D29.2 SW29.1 | length 3.3
  Solder Side w0.2: SW29.1@224.79,69.215 224.79,67.635 225.475,66.95 D29.2@225.475,66.15
NetD30_2: D30.2 SW30.1 | length 3.3
  Solder Side w0.2: SW30.1@243.84,69.215 243.84,67.635 244.525,66.95 D30.2@244.525,66.15

## Text inside footprints (layer, text, board x,y; h text height)
SW59: Top Assembly "NO" at 166.488,33.79 h0.5; Top Assembly "C" at 167.808,22.15 h0.5; Top Assembly "COM" at 159.788,31.25 h0.5; Top Assembly "A" at 165.268,22.15 h0.5
SW60: Top Assembly "NO" at 185.538,33.79 h0.5; Top Assembly "C" at 186.858,22.15 h0.5; Top Assembly "COM" at 178.838,31.25 h0.5; Top Assembly "A" at 184.318,22.15 h0.5
SW61: Top Assembly "NO" at 204.588,33.79 h0.5; Top Assembly "C" at 205.908,22.15 h0.5; Top Assembly "COM" at 197.888,31.25 h0.5; Top Assembly "A" at 203.368,22.15 h0.5
SW62: Top Assembly "NO" at 223.638,33.79 h0.5; Top Assembly "C" at 224.958,22.15 h0.5; Top Assembly "COM" at 216.938,31.25 h0.5; Top Assembly "A" at 222.418,22.15 h0.5
SW63: Top Assembly "NO" at 249.832,33.79 h0.5; Top Assembly "C" at 251.152,22.15 h0.5; Top Assembly "COM" at 243.132,31.25 h0.5; Top Assembly "A" at 248.612,22.15 h0.5
SW64: Top Assembly "NO" at 276.026,33.79 h0.5; Top Assembly "C" at 277.346,22.15 h0.5; Top Assembly "COM" at 269.326,31.25 h0.5; Top Assembly "A" at 274.806,22.15 h0.5
SW65: Top Assembly "NO" at 295.075,33.79 h0.5; Top Assembly "C" at 296.395,22.15 h0.5; Top Assembly "COM" at 288.375,31.25 h0.5; Top Assembly "A" at 293.855,22.15 h0.5
SW66: Top Assembly "NO" at 11.707,14.74 h0.5; Top Assembly "C" at 13.027,3.1 h0.5; Top Assembly "COM" at 5.007,12.2 h0.5; Top Assembly "A" at 10.487,3.1 h0.5
SW67: Top Assembly "NO" at 14.088,14.74 h0.5; Top Assembly "A" at 15.408,3.1 h0.5; Top Assembly "COM" at 7.388,12.2 h0.5; Top Assembly "C" at 12.868,3.1 h0.5
SW68: Top Assembly "NO" at 35.519,14.74 h0.5; Top Assembly "C" at 36.839,3.1 h0.5; Top Assembly "COM" at 28.819,12.2 h0.5; Top Assembly "A" at 34.299,3.1 h0.5
SW69: Top Assembly "NO" at 37.9,14.74 h0.5; Top Assembly "A" at 39.22,3.1 h0.5; Top Assembly "COM" at 31.2,12.2 h0.5; Top Assembly "C" at 36.68,3.1 h0.5
SW70: Top Assembly "NO" at 59.331,14.74 h0.5; Top Assembly "C" at 60.651,3.1 h0.5; Top Assembly "COM" at 52.631,12.2 h0.5; Top Assembly "A" at 58.111,3.1 h0.5
SW71: Top Assembly "NO" at 61.712,14.74 h0.5; Top Assembly "A" at 63.032,3.1 h0.5; Top Assembly "COM" at 55.012,12.2 h0.5; Top Assembly "C" at 60.492,3.1 h0.5
SW72: Top Assembly "NO" at 130.769,14.74 h0.5; Top Assembly "C" at 132.089,3.1 h0.5; Top Assembly "COM" at 124.069,12.2 h0.5; Top Assembly "A" at 129.549,3.1 h0.5
SW73: Top Assembly "NO" at 142.675,14.74 h0.5; Top Assembly "C" at 143.995,3.1 h0.5; Top Assembly "COM" at 135.975,12.2 h0.5; Top Assembly "A" at 141.455,3.1 h0.5
SW74: Top Assembly "NO" at 202.207,14.74 h0.5; Top Assembly "C" at 203.527,3.1 h0.5; Top Assembly "COM" at 195.507,12.2 h0.5; Top Assembly "A" at 200.987,3.1 h0.5
SW75: Top Assembly "NO" at 223.638,14.74 h0.5; Top Assembly "C" at 224.958,3.1 h0.5; Top Assembly "COM" at 216.938,12.2 h0.5; Top Assembly "A" at 222.418,3.1 h0.5
SW76: Top Assembly "NO" at 226.019,14.74 h0.5; Top Assembly "A" at 227.339,3.1 h0.5; Top Assembly "COM" at 219.319,12.2 h0.5; Top Assembly "C" at 224.799,3.1 h0.5
SW77: Top Assembly "NO" at 256.975,14.74 h0.5; Top Assembly "C" at 258.295,3.1 h0.5; Top Assembly "COM" at 250.275,12.2 h0.5; Top Assembly "A" at 255.755,3.1 h0.5
SW78: Top Assembly "NO" at 276.025,14.74 h0.5; Top Assembly "C" at 277.345,3.1 h0.5; Top Assembly "COM" at 269.325,12.2 h0.5; Top Assembly "A" at 274.805,3.1 h0.5
SW79: Top Assembly "NO" at 295.075,14.74 h0.5; Top Assembly "C" at 296.395,3.1 h0.5; Top Assembly "COM" at 288.375,12.2 h0.5; Top Assembly "A" at 293.855,3.1 h0.5